# EAGLE board transistor_switch (EAGLE 9.6.2)
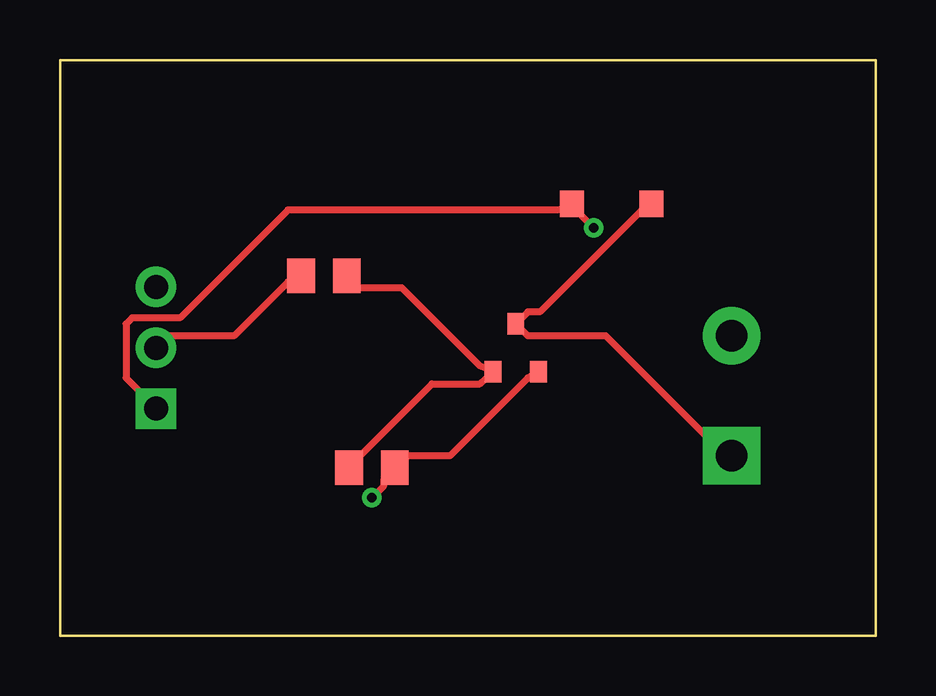
[diagram p0: board, top side]
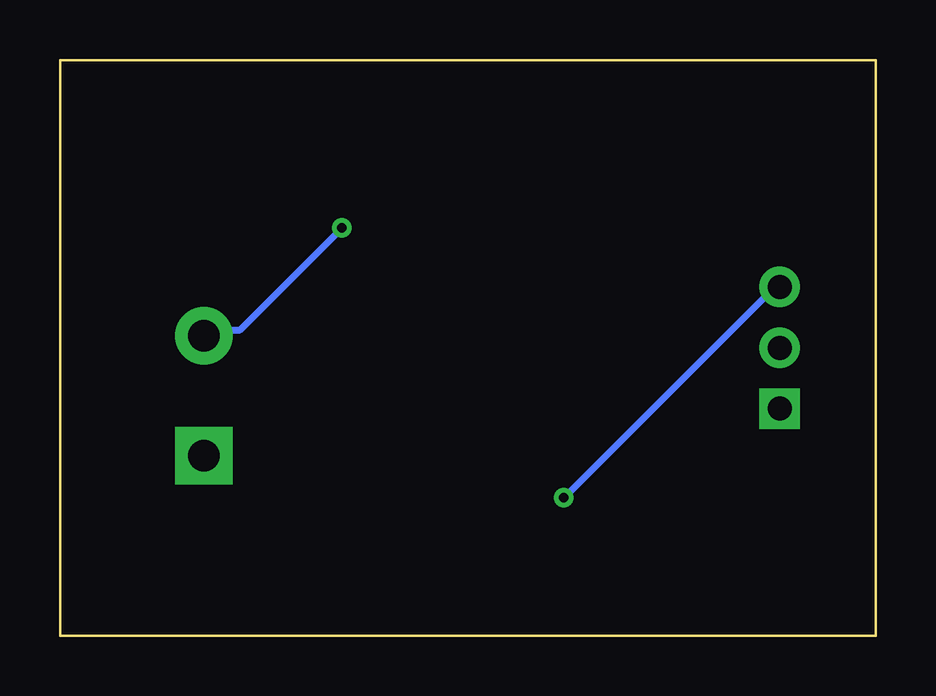
[diagram p1: board, bottom side, seen from below]

Size 34 x 24 mm. Coordinates in mm from the lower left corner, seen from the top.
Outline: 0,0 34,0 34,24 0,24 0,0
Copper layers used: Top, Bottom
Design rules "eh3d-kit": minimum track width 0.15mm, minimum drill 0.3mm, track to track 0.15mm, track to pad 0.15mm, pad to pad 0.15mm, via to via 0.15mm, smd to smd 0.15mm, copper to edge 0.3mm, drill to drill 0.25mm, minimum pad ring 0.15mm, minimum via ring 0.15mm

## Footprints (pad centres in the part's own frame; a part is rotated, then mirrored left to right if it is on the bottom)
SOD-123 = smd 1 x 1.1: 1 -1.65,0; 2 1.65,0
HDR-1X03 = drill 1 pad 1.7 square: 1 -2.54,0 | drill 1 pad 1.7: 2 0,0; 3 2.54,0
SOT-23 = smd 0.7 x 0.9: 1 -0.95,-1; 2 0.95,-1; 3 0,1
CHIP-0805 = smd 1.15 x 1.45: 1 -0.95,0; 2 0.95,0
TERM-2P-5.0 = drill 1.3 pad 2.4 square: 1 -2.5,0 | drill 1.3 pad 2.4: 2 2.5,0

## Placement (x,y rotation side)
D1  CLAMP  [SOD-123]  23,18 0 top
J1  CTRL  [HDR-1X03]  4,12 90 top
Q1  NPN  [SOT-23]  19,12 0 top
R1  1k  [CHIP-0805]  11,15 0 top
R2  100k  [CHIP-0805]  13,7 0 top
X1  LOAD  [TERM-2P-5.0]  28,10 90 top

## Library data of the parts
D1 J1 Q1 R1 R2 X1 = eh3d-kit

## Nets
BASE: Q1.1 R1.2 R2.1
COIL: D1.2 Q1.3 X1.1
CTRL: J1.2 R1.1
GND: J1.3 Q1.2 R2.2
VCC: D1.1 J1.1 X1.2

## Tracks (layer width: path | path; a pad name or v marks a point on that pad's centre or on a via)
BASE
  Top 0.3: R1.2 12.5,14.5 14.25,14.5 17.5,11.25 Q1.1 17.5,10.5 15.5,10.5 12.5,7.5 R2.1
COIL
  Top 0.3: D1.2 24.25,17.75 20,13.5 19.5,13.5 Q1.3 19.5,12.5 22.75,12.5 27.5,7.75 X1.1
CTRL
  Top 0.3: R1.1 9.5,14.75 7.25,12.5 4.5,12.5 J1.2
GND  (via drill 0.4 pad 0.8)
  Top 0.3: Q1.2 19.5,10.75 16.25,7.5 14.5,7.5 R2.2 13.5,6.5 13.5,6.25 v13,5.75
  Bottom 0.3: J1.3 4.5,14.25 v13,5.75
VCC  (via drill 0.4 pad 0.8)
  Top 0.3: J1.1 3.5,10 2.75,10.75 2.75,13 3,13.25 5,13.25 9.5,17.75 20.75,17.75 D1.1 21.75,17.5 v22.25,17
  Bottom 0.3: X1.2 27.5,12.75 26.5,12.75 v22.25,17